# Altium PCB HIL_project.PcbDoc (part 1 of 3)
Units mm, origin at the board's own origin, x right, y up, seen from the top; angles counter-clockwise.
Board outline 165 x 120 mm, 2 copper layers (Top Layer, Bottom Layer); 116 components, 232 nets, 732 pads, 1218 vias.
Unrouted connection lines stored in the file: 107.
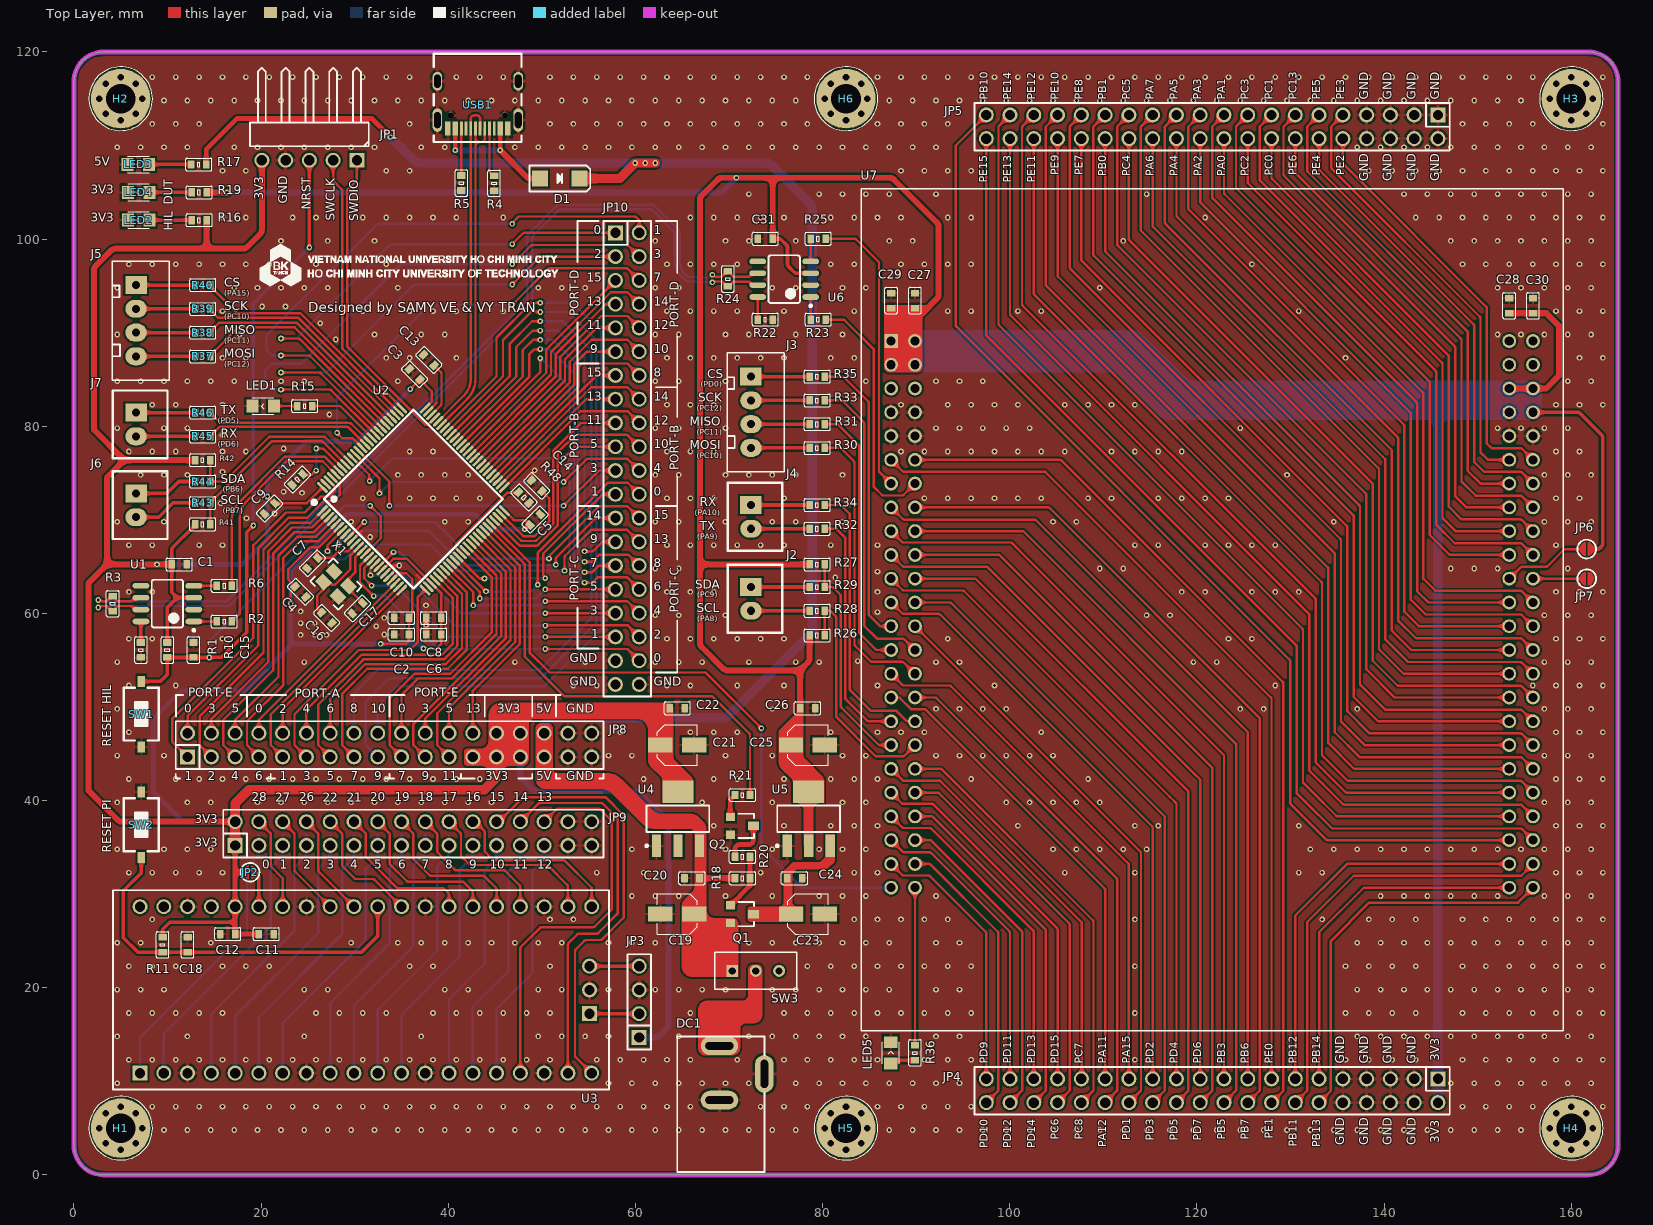
[diagram p0: Top Layer view]
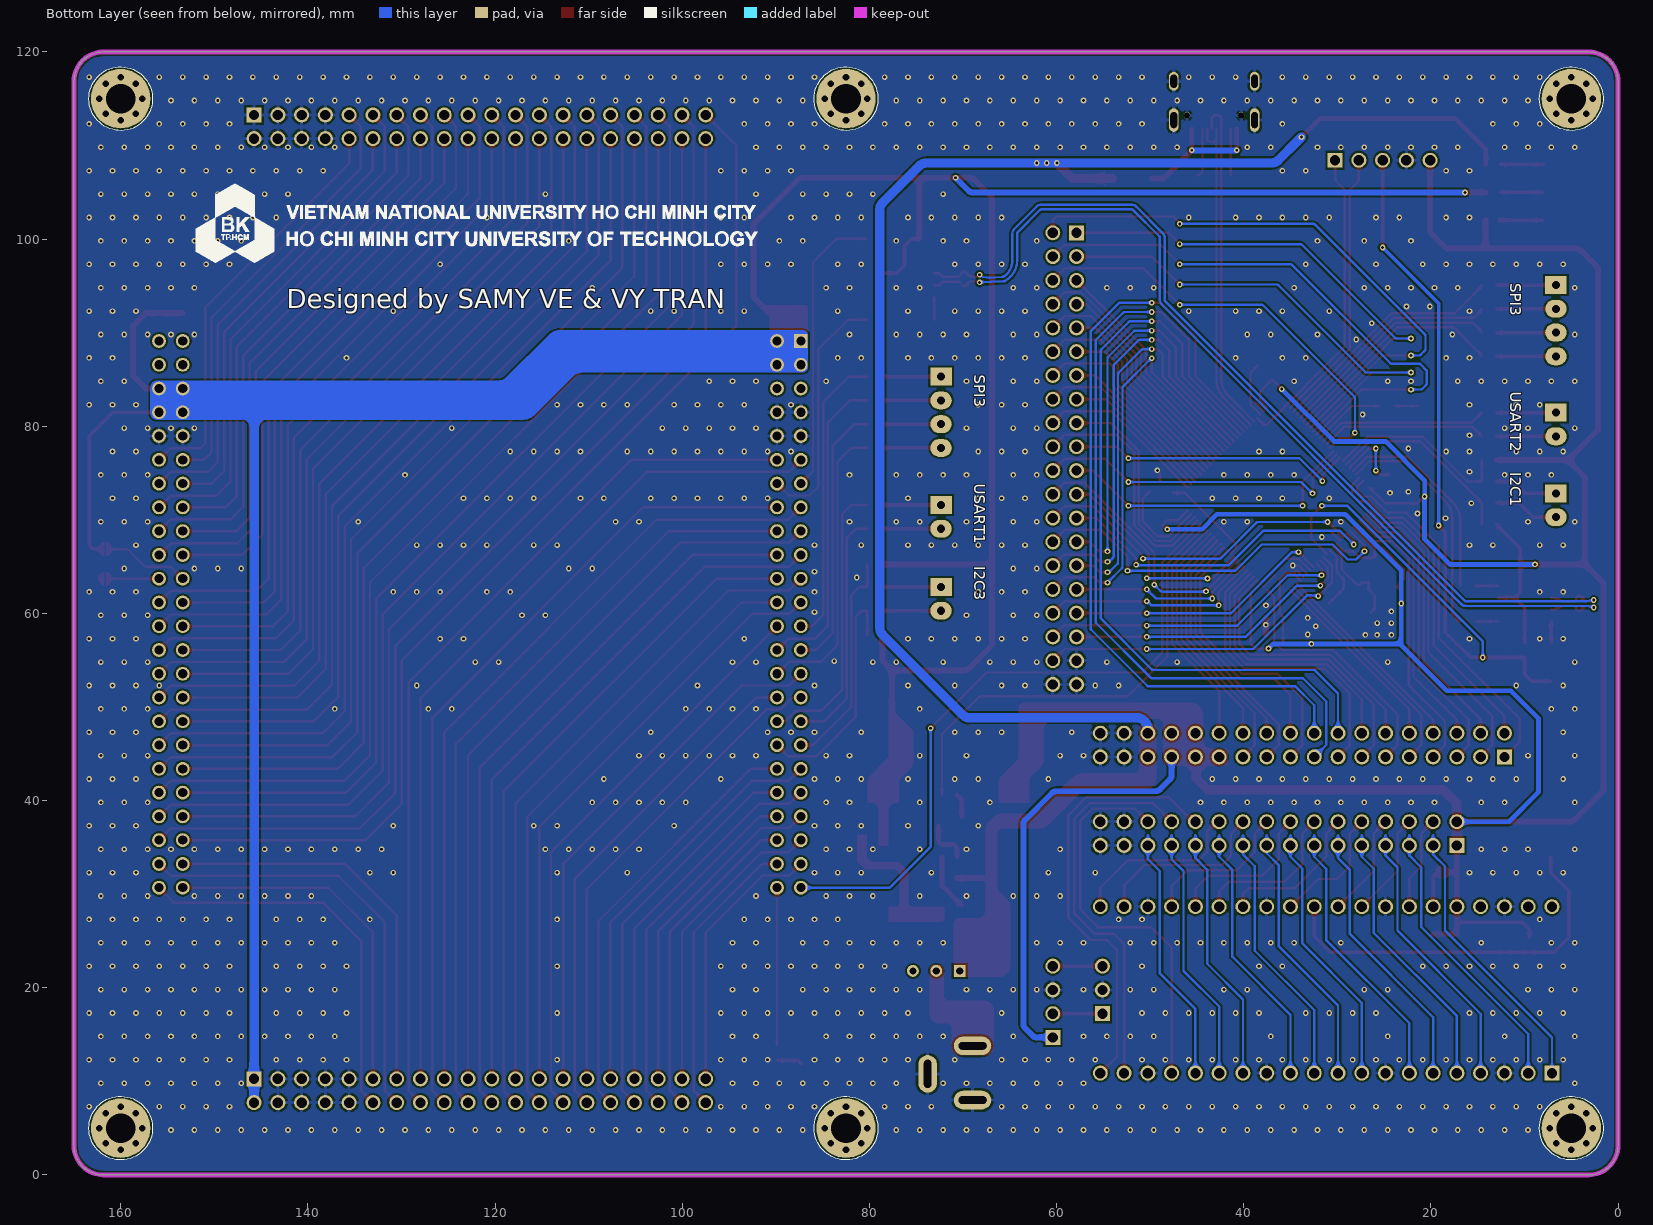
[diagram p1: Bottom Layer view, seen from below]

## Layer stack, top to bottom
Top Solder: solder mask 0.0102, Solder Resist, Dk 3.5
Top Layer: signal copper 0.0356
Dielectric 1: dielectric 0.32, FR-4, Dk 4.8
Bottom Layer: signal copper 0.0356
Bottom Solder: solder mask 0.0102, Solder Resist, Dk 3.5

## Board outline
0,3.15 0,116.85 cw(c3.15,116.85) 3.15,120 161.85,120 cw(c161.85,116.85) 165,116.85 165,3.15 cw(c161.85,3.15) 161.85,0 3.15,0 cw(c3.15,3.15)

## Design rules (kind name [scope] priority, off if disabled: settings)
Clearance [All] p1: gap=0.203 ignorepadtopadclearanceinfootprint=TRUE except(0.178: Arc-Arc Arc-Track Track-Track)
DiffPairsRouting [All] p1: maxlimit=0.254 minlimit=0.203 mostfreqgap=0.254 toplayer_minwidth=0.254 toplayer_maxwidth=0.381 toplayer_prefwidth=0.254 bottomlayer_minwidth=0.254 bottomlayer_maxwidth=0.381 bottomlayer_prefwidth=0.254 maxuncoupledlength=12.7
HoleSize [All] p1: absolutevalues=TRUE maxlimit=4 minlimit=0.025 maxpercent=80.000 minpercent=20.000
MinimumSolderMaskSliver [All] p1: minsoldermaskwidth=0.1
PolygonConnect [All] p1: thpad.connectstyle=Relief thpad.reliefconductorwidth=0.381 thpad.reliefentries=4 thpad.polygonreliefangle="90 Angle" thpad.airgapwidth=0.254 smdpad.connectstyle=Relief smdpad.reliefconductorwidth=0.254 smdpad.reliefentries=4 smdpad.polygonreliefangle="90 Angle" smdpad.airgapwidth=0.254 via.connectstyle=Direct via.reliefconductorwidth=0.254 via.reliefentries=4 via.polygonreliefangle="90 Angle" via.airgapwidth=0.254
RoutingVias [All] p1: holewidth=0.3 width=0.6 viastyle="Through Hole" minholewidth=0.3 minwidth=0.6 maxholewidth=0.711 maxwidth=1.27
SilkToSilkClearance [All] p1: silktosilkclearance=0.12
SilkToSolderMaskClearance [IsPad] p1: minsilkscreentomaskgap=0.12 clearancetoexposedcopper=TRUE
SolderMaskExpansion [All] p1: expansion=0.102 istentingtop=FALSE
SupplyNets "Schematic Supply Nets_3" [InNet('+3.3 DUT')] p1: voltage=0.000
SupplyNets "Schematic Supply Nets_2" [InNet('+3.3 HIL')] p2: voltage=0.000
SupplyNets "Schematic Supply Nets_1" [InNet('GND')] p3: voltage=0.000
SupplyNets "Schematic Supply Nets" [InNet('+5')] p4: voltage=0.000
Width [All] p1: maxlimit=2.54 minlimit=0.254 preferedwidth=0.254
25 further rules are at their usual default settings.

## Classes and differential pairs
component class Power: C19 C20 C21 C22 C23 C24 C25 C26 DC1 H1 H2 H3 H4 H5 H6 LED2 LED3 LED4 Q1 Q2 R16 R17 R18 R19 R20 R21 SW3 U4 U5
component class HIL_Header: J5 J6 J7 JP8 JP9 JP10 R37 R38 R39 R40 R41 R42 R43 R44 R45 R46
component class HIL: C1 C2 C3 C4 C5 C6 C7 C8 C9 C10 C11 C12 C13 C14 C15 C16 C17 C18 D1 JP1 JP2 JP3 LED1 R1 R2 R3 R4 R5 R6 R10 R11 R14 R15 R48 SW1 SW2 U1 U2 U3 USB1 X1
component class DUT: C27 C28 C29 C30 C31 J2 J3 J4 JP4 JP5 JP6 JP7 LED5 R22 R23 R24 R25 R26 R27 R28 R29 R30 R31 R32 R33 R34 R35 R36 U6 U7
differential pair CAN: +CAN_P -CAN_N
differential pair HIL_D: +HIL_D_P -HIL_D_N

## Components (designator, comment, footprint, x,y, rotation, side; value= is the part's Value field where it differs from the comment)
C1 "0.1uF" CN-SMD-0603 11.256,65.238 r0 top value=33pF
C2 "4.7uF" CN-SMD-0603 35.005,57.745 r180 top value=33pF
C3 "0.1uF" CN-SMD-0603 36.402,85.558 r135 top value=33pF
C4 "0.1uF" CN-SMD-0603 24.21,62.317 r315 top value=33pF
C5 "0.1uF" CN-SMD-0603 49.276,70.028 r45 top value=33pF
C6 "0.1uF" CN-SMD-0603 38.434,57.745 r180 top value=33pF
C7 "1uF" CN-SMD-0603 25.48,65.365 r225 top value=33pF
C8 "0.1uF" CN-SMD-0603 38.434,59.523 r180 top value=33pF
C9 "0.1uF" CN-SMD-0603 20.908,71.207 r225 top value=33pF
C10 "1uF" CN-SMD-0603 35.005,59.523 r180 top value=33pF
C11 "0.1uF" CN-SMD-0603 20.565,25.741 r0 top value=33pF
C12 "4.7uF" CN-SMD-0603 16.425,25.741 r180 top value=33pF
C13 "1uF" CN-SMD-0603 37.926,87.082 r315 top value=33pF
C14 "1uF" CN-SMD-0603 49.454,73.635 r315 top value=33pF
C15 "0.1uF" CN-SMD-0603 12.78,56.094 r270 top value=33pF
C16 "10pF" CN-SMD-0603 27.004,59.523 r135 top value=33pF
C17 "10pF" CN-SMD-0603 30.306,60.539 r225 top value=33pF
C18 "0.1uF" CN-SMD-0603 12.145,24.598 r270 top value=33pF
C19 "10uF" CAP-ALU-SMD-4.5x5x1.4 64.469,27.875 r180 top value=104
C20 "0.1uF" CN-SMD-0603 66.044,31.71 r0 top value=33pF
C21 "10uF" CAP-ALU-SMD-4.5x5x1.4 64.469,45.934 r0 top value=104
C22 "0.1uF" CN-SMD-0603 64.469,49.871 r180 top value=33pF
C23 "10uF" CAP-ALU-SMD-4.5x5x1.4 78.43,27.875 r0 top value=104
C24 "0.1uF" CN-SMD-0603 77.005,31.71 r180 top value=33pF
C25 "10uF" CAP-ALU-SMD-4.5x5x1.4 78.43,45.934 r0 top value=104
C26 "0.1uF" CN-SMD-0603 78.392,49.871 r180 top value=33pF
C27 "0.1uF" CN-SMD-0603 89.869,93.432 r90 top value=33pF
C28 "0.1uF" CN-SMD-0603 153.369,92.886 r90 top value=33pF
C29 "0.1uF" CN-SMD-0603 87.329,93.432 r90 top value=33pF
C30 "0.1uF" CN-SMD-0603 155.909,92.886 r90 top value=33pF
C31 "0.1uF" CN-SMD-0603 73.874,100.036 r180 top value=33pF
D1 "SS34" DIO-SMD-A 51.918,106.477 r180 top value=1N5007
DC1 "Jack DC" DC0 68.975,10.9 r90 top value="Jac DC"
H1 "M3" M3 5,5 r0 top
H2 "M3" M3 5,115 r0 top
H3 "M3" M3 160,115 r0 top
H4 "M3" M3 160,5 r0 top
H5 "M3" M3 82.5,5 r0 top
H6 "M3" M3 82.5,115 r0 top
J2 "Header2" XH2.54-2-DIP 72.343,61.555 r270 top
J3 "Header4" XH2.54-4-DIP 72.343,81.494 r270 top
J4 "Header2" XH2.54-2-DIP 72.343,70.318 r270 top
J5 "Header4" XH2.54-4-DIP 6.644,91.279 r270 top
J6 "Header2" XH2.54-2-DIP 6.644,71.556 r270 top
J7 "Header2" XH2.54-2-DIP 6.644,80.192 r270 top
JP1 "JP5" JP5-D1C 18.81,110.965 r180 top
JP2 "JUMP2" JUMP2 18.817,32.345 r270 top
JP3 "JP4" JP4-D1T 60.405,14.692 r90 top
JP4 "JP20x2" JP20-D2T 121.619,9 r180 top
JP5 "JP20x2" JP20-D2T 121.619,112 r180 top
JP6 "JUMP2" JUMP2 161.65,66.875 r270 top
JP7 "JUMP2" JUMP2 161.65,63.714 r90 top
JP8 "JP18x2" JP18-D2T 33.735,45.934 r0 top
JP9 "JP16x2" JP16-D2T 36.275,36.477 r0 top
JP10 "JP20x2" JP20-D2T 59.135,76.541 r270 top
LED1 "LED" LED-0805-Red 20.222,82.159 r180 top value="LED 3 - 5 ly 2 Colour"
LED2 "LED" LED-0805-Red 6.933,102.022 r180 top value="LED 3 - 5 ly 2 Colour"
LED3 "LED" LED-0805-Red 6.883,107.974 r180 top value="LED 3 - 5 ly 2 Colour"
LED4 "LED" LED-0805-Red 6.933,104.998 r180 top value="LED 3 - 5 ly 2 Colour"
LED5 "LED" LED-0805-Red 87.278,13.041 r90 top value="LED 3 - 5 ly 2 Colour"
Q1 "AO3401" SOT23-123 71.403,27.875 r270 top
Q2 "2N222" SOT23-231 71.403,37.298 r270 top value=C1815
R1 "10k" RES-SMD-0603 7.161,56.094 r90 top
R2 "22R" RES-SMD-0603 16.082,59.142 r0 top
R3 "120R" RES-SMD-0603 4.144,61.047 r90 top
R4 "5.1k" RES-SMD-0603 44.907,105.969 r270 top
R5 "5.1k" RES-SMD-0603 41.407,105.994 r270 top
R6 "22R" RES-SMD-0603 16.082,62.952 r0 top
R10 "10k" RES-SMD-0603 9.986,56.094 r270 top
R11 "10k" RES-SMD-0603 9.478,24.598 r270 top
R14 "10k" RES-SMD-0603 23.887,74.313 r225 top
R15 "1k" RES-SMD-0603 24.667,82.159 r0 top
R16 "1k" RES-SMD-0603 13.385,102.022 r180 top
R17 "3k3" RES-SMD-0603 13.335,107.974 r180 top
R18 "10k" RES-SMD-0603 71.441,31.71 r180 top
R19 "1k" RES-SMD-0603 13.385,104.998 r180 top
R20 "1k" RES-SMD-0603 71.441,33.996 r180 top
R21 "1k" RES-SMD-0603 71.441,40.6 r0 top
R22 "10k" RES-SMD-0603 73.874,91.4 r180 top
R23 "22R" RES-SMD-0603 79.524,91.4 r0 top
R24 "120R" RES-SMD-0603 69.879,95.741 r90 top
R25 "22R" RES-SMD-0603 79.524,100.036 r0 top
R26 "4.7k" RES-SMD-0603 79.417,57.658 r0 top
R27 "4.7k" RES-SMD-0603 79.417,65.238 r0 top
R28 "22R" RES-SMD-0603 79.417,60.285 r180 top
R29 "22R" RES-SMD-0603 79.417,62.825 r180 top
R30 "22R" RES-SMD-0603 79.417,77.684 r180 top
R31 "22R" RES-SMD-0603 79.417,80.224 r180 top
R32 "22R" RES-SMD-0603 79.417,69.048 r180 top
R33 "22R" RES-SMD-0603 79.417,82.764 r180 top
R34 "22R" RES-SMD-0603 79.417,71.588 r180 top
R35 "22R" RES-SMD-0603 79.417,85.304 r180 top
R36 "1k" RES-SMD-0603 89.869,13.041 r90 top
R37 "22R" RES-SMD-0603 13.756,87.469 r180 top
R38 "22R" RES-SMD-0603 13.756,90.009 r180 top
R39 "22R" RES-SMD-0603 13.756,92.549 r180 top
R40 "22R" RES-SMD-0603 13.756,95.089 r180 top
R41 "4.7k" RES-SMD-0603 13.756,69.524 r0 top
R42 "4.7k" RES-SMD-0603 13.756,76.382 r0 top
R43 "22R" RES-SMD-0603 13.756,71.81 r180 top
R44 "22R" RES-SMD-0603 13.756,74.096 r180 top
R45 "22R" RES-SMD-0603 13.756,78.922 r180 top
R46 "22R" RES-SMD-0603 13.756,81.462 r180 top
R48 "10k" RES-SMD-0603 48.08,72.388 r135 top
SW1 "SW" SW1-SMD 7.192,49.236 r90 top value="SW chip 2 pin"
SW2 "SW" SW1-SMD 7.192,37.425 r270 top value="SW chip 2 pin"
SW3 "Switch 3x1" SS12D00 72.851,21.804 r90 top value="Switch 4x2"
U1 "SN65HVD230DR" SO8 9.986,61.047 r180 top
U2 "STM32F407VET6" LQFP100 36.275,72.223 r45 top locked
U3 "Raspberry Pi Pico" "RASPBERRY PI PICO" 31.195,19.772 r90 top locked
U4 "LM1117-3.3V" SOT223 64.544,38.06 r0 top
U5 "LM1117-3.3V" SOT223 78.505,38.06 r0 top
U6 "SN65HVD230DR" SO8 75.899,95.718 r180 top
U7 "STM32F407 DEV KIT" "STM32F407 DEV KIT" 121.619,59.904 r0 top locked
USB1 "USB TYPE C" "TYPE C 16P" 43.155,115.799 r180 top
X1 "8MHz" XT4-16.000MHZ-4_V 27.99,63.149 r315 top value=4Mhz

## Footprints (in the part's own frame and the unit in brackets; to place one, negate y for a bottom-side part, rotate by r counter-clockwise, add the part's x,y. Pads: shape width x height; smd on the part's side, far side on the other; paste and mask are expansions set on the pad)
CAP-ALU-SMD-4.5x5x1.4 [mm]
  rect 2.6x1.6 smd: 1(-1.8,0) 2(1.8,0)
  silkscreen extent -2.15,-2.15 2.15,2.15, body extent -2.5,-2.15 2.5,2.15, height 5.45
CN-SMD-0603 [mm]
  rrect10% 0.7x0.9 smd: 1(-0.8,0) 2(0.8,0)
  silkscreen extent -1.4,-0.67 1.4,0.68, body extent -0.8,-0.4 0.8,0.4, height 0.3
DC0 [mm] "Jac DC input"
  oval 2x4 hole 0.8 slot 3 at 90 deg: 1(2.9,0) 2(-2.9,0)
  oval 4x2 hole 0.8 slot 3 at 0 deg: 3(-0.1,-4.8)
  silkscreen extent -10.6,-4.8 3.9,4.5, body extent -10.6,-4.9 3.9,4.5, height 10.7
DIO-SMD-A [mm]
  rect 1.7x1.7 smd: 1(2.1,0) 2(-2.1,0)
  silkscreen extent -3.25,-1.4 3.25,1.4, body extent -2.6,-1.3 2.6,1.3, height 2.4
JP4-D1T [mm] "4 pins, 1 row, straight, gold plating"
  rect 1.6x1.6 hole 1.1: 1(0,0)
  round 1.6 hole 1.1: 2(2.54,0) 3(5.08,0) 4(7.62,0)
  silkscreen extent -1.27,-1.27 8.89,1.27, body extent -1.27,-1.27 8.89,1.27, height 8.54
JP5-D1C [mm] "5 pins, 1 row, right angled, gold plating"
  rect 1.6x1.6 hole 1.1: 1(-11.43,2.54)
  round 1.6 hole 1.1: 2(-8.89,2.54) 3(-6.35,2.54) 4(-3.81,2.54) 5(-1.27,2.54)
  silkscreen extent -12.7,-7.34 0,1.04, body extent -12.7,-7.52 0,2.84, height 2.55
JP16-D2T [mm] "32 pins, dual pin, straight, gold plating"
  rect 1.6x1.6 hole 1.1: 1(-19.05,-1.27)
  round 1.6 hole 1.1: 2(-16.51,-1.27) 3(-13.97,-1.27) 4(-11.43,-1.27) 5(-8.89,-1.27) 6(-6.35,-1.27) 7(-3.81,-1.27) 8(-1.27,-1.27) 9(1.27,-1.27) 10(3.81,-1.27) 11(6.35,-1.27) 12(8.89,-1.27) 13(11.43,-1.27) 14(13.97,-1.27) 15(16.51,-1.27) 16(19.05,-1.27) 17(19.05,1.27) 18(16.51,1.27) 19(13.97,1.27) 20(11.43,1.27) 21(8.89,1.27) 22(6.35,1.27) 23(3.81,1.27) 24(1.27,1.27) 25(-1.27,1.27) 26(-3.81,1.27) 27(-6.35,1.27) 28(-8.89,1.27) 29(-11.43,1.27) 30(-13.97,1.27) 31(-16.51,1.27) 32(-19.05,1.27)
  silkscreen extent -20.32,-2.54 20.32,2.54, body extent -20.32,-2.54 20.32,2.54, height 8.55
JP18-D2T [mm] "36 pins, dual pin, straight, gold plating"
  rect 1.6x1.6 hole 1.1: 1(-21.59,-1.27)
  round 1.6 hole 1.1: 2(-19.05,-1.27) 3(-16.51,-1.27) 4(-13.97,-1.27) 5(-11.43,-1.27) 6(-8.89,-1.27) 7(-6.35,-1.27) 8(-3.81,-1.27) 9(-1.27,-1.27) 10(1.27,-1.27) 11(3.81,-1.27) 12(6.35,-1.27) 13(8.89,-1.27) 14(11.43,-1.27) 15(13.97,-1.27) 16(16.51,-1.27) 17(19.05,-1.27) 18(21.59,-1.27) 19(21.59,1.27) 20(19.05,1.27) 21(16.51,1.27) 22(13.97,1.27) 23(11.43,1.27) 24(8.89,1.27) 25(6.35,1.27) 26(3.81,1.27) 27(1.27,1.27) 28(-1.27,1.27) 29(-3.81,1.27) 30(-6.35,1.27) 31(-8.89,1.27) 32(-11.43,1.27) 33(-13.97,1.27) 34(-16.51,1.27) 35(-19.05,1.27) 36(-21.59,1.27)
  silkscreen extent -22.86,-2.54 22.86,2.54, body extent -22.86,-2.54 22.86,2.54, height 8.55
JP20-D2T [mm] "40 pins, dual pin, straight, gold plating"
  rect 1.6x1.6 hole 1.1: 1(-24.13,-1.27)
  round 1.6 hole 1.1: 2(-21.59,-1.27) 3(-19.05,-1.27) 4(-16.51,-1.27) 5(-13.97,-1.27) 6(-11.43,-1.27) 7(-8.89,-1.27) 8(-6.35,-1.27) 9(-3.81,-1.27) 10(-1.27,-1.27) 11(1.27,-1.27) 12(3.81,-1.27) 13(6.35,-1.27) 14(8.89,-1.27) 15(11.43,-1.27) 16(13.97,-1.27) 17(16.51,-1.27) 18(19.05,-1.27) 19(21.59,-1.27) 20(24.13,-1.27) 21(24.13,1.27) 22(21.59,1.27) 23(19.05,1.27) 24(16.51,1.27) 25(13.97,1.27) 26(11.43,1.27) 27(8.89,1.27) 28(6.35,1.27) 29(3.81,1.27) 30(1.27,1.27) 31(-1.27,1.27) 32(-3.81,1.27) 33(-6.35,1.27) 34(-8.89,1.27) 35(-11.43,1.27) 36(-13.97,1.27) 37(-16.51,1.27) 38(-19.05,1.27) 39(-21.59,1.27) 40(-24.13,1.27)
  silkscreen extent -25.4,-2.54 25.4,2.54, body extent -25.4,-2.54 25.4,2.54, height 8.55
JUMP2 [mil]
  round 1 smd: 1(0,17.33) 2(0,-17.33)
  Top Layer region: -29.08,5.13 -23.68,17.63 -13.25,26.39 0,29.53 13.25,26.39 23.68,17.63 29.08,5.13 29.08,5.13
  Top Layer region: 29.08,-5.13 23.68,-17.63 13.25,-26.39 0,-29.53 -13.25,-26.39 -23.68,-17.63 -29.08,-5.13 -29.08,-5.13
  silkscreen extent -39,-39 39,39
LED-0805-Red [mil]
  rect 50x55 smd: 1(-45,0) 2(45,0)
  silkscreen extent -45,-35 45,35, body extent -40,-25 40,25, height 43
LQFP100 [mm]
  rect 1.5x0.32 smd: 1(-7.75,6)
  oval 1.5x0.32 smd: 2(-7.75,5.5) 3(-7.75,5) 4(-7.75,4.5) 5(-7.75,4) 6(-7.75,3.5) 7(-7.75,3) 8(-7.75,2.5) 9(-7.75,2) 10(-7.75,1.5) 11(-7.75,1) 12(-7.75,0.5) 13(-7.75,0) 14(-7.75,-0.5) 15(-7.75,-1) 16(-7.75,-1.5) 17(-7.75,-2) 18(-7.75,-2.5) 19(-7.75,-3) 20(-7.75,-3.5) 21(-7.75,-4) 22(-7.75,-4.5) 23(-7.75,-5) 24(-7.75,-5.5) 25(-7.75,-6) 51(7.75,-6) 52(7.75,-5.5) 53(7.75,-5) 54(7.75,-4.5) 55(7.75,-4) 56(7.75,-3.5) 57(7.75,-3) 58(7.75,-2.5) 59(7.75,-2) 60(7.75,-1.5) 61(7.75,-1) 62(7.75,-0.5) 63(7.75,0) 64(7.75,0.5) 65(7.75,1) 66(7.75,1.5) 67(7.75,2) 68(7.75,2.5) 69(7.75,3) 70(7.75,3.5) 71(7.75,4) 72(7.75,4.5) 73(7.75,5) 74(7.75,5.5) 75(7.75,6)
  oval 0.32x1.5 smd: 26(-6,-7.75) 27(-5.5,-7.75) 28(-5,-7.75) 29(-4.5,-7.75) 30(-4,-7.75) 31(-3.5,-7.75) 32(-3,-7.75) 33(-2.5,-7.75) 34(-2,-7.75) 35(-1.5,-7.75) 36(-1,-7.75) 37(-0.5,-7.75) 38(0,-7.75) 39(0.5,-7.75) 40(1,-7.75) 41(1.5,-7.75) 42(2,-7.75) 43(2.5,-7.75) 44(3,-7.75) 45(3.5,-7.75) 46(4,-7.75) 47(4.5,-7.75) 48(5,-7.75) 49(5.5,-7.75) 50(6,-7.75) 76(6,7.75) 77(5.5,7.75) 78(5,7.75) 79(4.5,7.75) 80(4,7.75) 81(3.5,7.75) 82(3,7.75) 83(2.5,7.75) 84(2,7.75) 85(1.5,7.75) 86(1,7.75) 87(0.5,7.75) 88(0,7.75) 89(-0.5,7.75) 90(-1,7.75) 91(-1.5,7.75) 92(-2,7.75) 93(-2.5,7.75) 94(-3,7.75) 95(-3.5,7.75) 96(-4,7.75) 97(-4.5,7.75) 98(-5,7.75) 99(-5.5,7.75) 100(-6,7.75)
  silkscreen extent -7.95,-6.75 6.75,7.45, body extent -8,-8 8,8, height 1.6
M3 [mm]
  round 1 hole 0.7: 1(-2.286,0) 1(-1.616,-1.616) 1(-1.616,1.616) 1(0,-2.286) 1(0,2.286) 1(1.616,-1.616) 1(1.616,1.616) 1(2.286,0)
  round 6.35 hole 3.18: 1(0,0)
  silkscreen extent -3.4,-3.4 3.4,3.4
"RASPBERRY PI PICO" [mm]
  rect 1.6x1.6 hole 1.1: 1(-8.89,24.13) D1(-2.54,-23.9)
  round 1.6 hole 1.1: 2(-8.89,21.59) 3(-8.89,19.05) 4(-8.89,16.51) 5(-8.89,13.97) 6(-8.89,11.43) 7(-8.89,8.89) 8(-8.89,6.35) 9(-8.89,3.81) 10(-8.89,1.27) 11(-8.89,-1.27) 12(-8.89,-3.81) 13(-8.89,-6.35) 14(-8.89,-8.89) 15(-8.89,-11.43) 16(-8.89,-13.97) 17(-8.89,-16.51) 18(-8.89,-19.05) 19(-8.89,-21.59) 20(-8.89,-24.13) 21(8.89,-24.13) 22(8.89,-21.59) 23(8.89,-19.05) 24(8.89,-16.51) 25(8.89,-13.97) 26(8.89,-11.43) 27(8.89,-8.89) 28(8.89,-6.35) 29(8.89,-3.81) 30(8.89,-1.27) 31(8.89,1.27) 32(8.89,3.81) 33(8.89,6.35) 34(8.89,8.89) 35(8.89,11.43) 36(8.89,13.97) 37(8.89,16.51) 38(8.89,19.05) 39(8.89,21.59) 40(8.89,24.13) D2(0,-23.9) D3(2.54,-23.9)
  silkscreen extent -10.65,-26 10.65,27, body extent -10.5,-25.65 10.5,26.8, height 14.79
RES-SMD-0603 [mm]
  rrect10% 0.7x0.9 smd: 1(-0.8,0) 2(0.8,0)
  silkscreen extent -1.4,-0.67 1.4,0.68, body extent -0.8,-0.4 0.8,0.4, height 0.43
SO8 [mm] "SOIC, 8-Leads, Body 4.9x3.9mm, Pitch 1.27mm, IPC High Density"
  oval 1.8x0.6 smd: 1(-2.825,1.905) 2(-2.825,0.635) 3(-2.825,-0.635) 4(-2.825,-1.905) 5(2.825,-1.905) 6(2.825,-0.635) 7(2.825,0.635) 8(2.825,1.905)
  silkscreen extent -2.95,-2.55 1.68,2.98, body extent -2.99,-2.45 3,2.45, height 1.6
SOT23-123 [mm] "SOT23, 1=bottom-left, 2=top, 3=bottom-right"
  rect 0.9x0.95 smd: 1(-0.95,-1.25) 3(0.95,-1.25)
  rect 0.9x1.2 smd: 2(0,1.2)
  silkscreen extent -1.3,-0.38 1.3,1.25, body extent -1.52,-1.23 1.48,1.27, height 1.15
SOT23-231 [mm]
  rect 0.9x0.95 smd mask+0: 1(0.95,-1.25)
  rect 0.9x0.95 smd: 2(-0.95,-1.25)
  rect 0.9x1.2 smd: 3(0,1.2)
  silkscreen extent -1.3,-0.38 1.3,1.25, body extent -1.52,-1.23 1.48,1.27, height 1.15
SOT223 [mm]
  rect 1x2.4 smd: 1(-2.3,-2.9) 2(0,-2.9) 3(2.3,-2.9)
  rect 3.3x2.4 smd: 4(0,2.9)
  silkscreen extent -3.47,-3.02 3.35,1.4, body extent -3.25,-3.56 3.25,3.4, height 1.68
SS12D00 [mil]
  rect 50x50 hole 30 paste-99999 mask+0: 1(0,98.43)
  round 50 hole 30 paste-99999 mask+0: 2(0,0) 3(0,-98.43)
  silkscreen extent -78,-172 78,172, body extent -69,-167 69,167, height 245
"STM32F407 DEV KIT" [mm]
  rect 1.478x1.478 hole 0.97: 1(-34.29,29.21)
  round 1.478 hole 0.97: 2(-31.75,29.21) 3(-34.29,26.67) 4(-31.75,26.67) 5(-34.29,24.13) 6(-31.75,24.13) 7(-34.29,21.59) 8(-31.75,21.59) 9(-34.29,19.05) 10(-31.75,19.05) 11(-34.29,16.51) 12(-31.75,16.51) 13(-34.29,13.97) 14(-31.75,13.97) 15(-34.29,11.43) 16(-31.75,11.43) 17(-34.29,8.89) 18(-31.75,8.89) 19(-34.29,6.35) 20(-31.75,6.35) 21(-34.29,3.81) 22(-31.75,3.81) 23(-34.29,1.27) 24(-31.75,1.27) 25(-34.29,-1.27) 26(-31.75,-1.27) 27(-34.29,-3.81) 28(-31.75,-3.81) 29(-34.29,-6.35) 30(-31.75,-6.35) 31(-34.29,-8.89) 32(-31.75,-8.89) 33(-34.29,-11.43) 34(-31.75,-11.43) 35(-34.29,-13.97) 36(-31.75,-13.97) 37(-34.29,-16.51) 38(-31.75,-16.51) 39(-34.29,-19.05) 40(-31.75,-19.05) 41(-34.29,-21.59) 42(-31.75,-21.59) 43(-34.29,-24.13) 44(-31.75,-24.13) 45(-34.29,-26.67) 46(-31.75,-26.67) 47(-34.29,-29.21) 48(-31.75,-29.21) 49(31.75,29.21) 50(34.29,29.21) 51(31.75,26.67) 52(34.29,26.67) 53(31.75,24.13) 54(34.29,24.13) 55(31.75,21.59) 56(34.29,21.59) 57(31.75,19.05) 58(34.29,19.05) 59(31.75,16.51) 60(34.29,16.51) 61(31.75,13.97) 62(34.29,13.97) 63(31.75,11.43) 64(34.29,11.43) 65(31.75,8.89) 66(34.29,8.89) 67(31.75,6.35) 68(34.29,6.35) 69(31.75,3.81) 70(34.29,3.81) 71(31.75,1.27) 72(34.29,1.27) 73(31.75,-1.27) 74(34.29,-1.27) 75(31.75,-3.81) 76(34.29,-3.81) 77(31.75,-6.35) 78(34.29,-6.35) 79(31.75,-8.89) 80(34.29,-8.89) 81(31.75,-11.43) 82(34.29,-11.43) 83(31.75,-13.97) 84(34.29,-13.97) 85(31.75,-16.51) 86(34.29,-16.51) 87(31.75,-19.05) 88(34.29,-19.05) 89(31.75,-21.59) 90(34.29,-21.59) 91(31.75,-24.13) 92(34.29,-24.13) 93(31.75,-26.67) 94(34.29,-26.67) 95(31.75,-29.21) 96(34.29,-29.21)
  silkscreen extent -37.5,-44.5 37.5,45.5, body extent -36.25,-42.55 36.25,44.05, height 14.2
SW1-SMD [mm]
  rect 1.2x0.8 smd: 1(-3.5,0) 2(3.5,0)
  silkscreen extent -2.82,-1.85 2.82,1.85, body extent -3.05,-1.85 3.05,1.85, height 2.5
"TYPE C 16P" [mm]
  rect 0.6x1.5 smd: A1(-3.202,4) A4(-2.402,4) B1(3.198,4) B4(2.398,4)
  rect 0.3x1.5 smd: A5(-1.252,4) A6(-0.252,4) A7(0.248,4) A8(-1.752,4) B5(1.748,4) B6(0.748,4) B7(-0.752,4) B8(1.248,4)
  oval 1x2.5 hole 0.7 slot 1.7 at 90 deg: SHIELD(-4.322,3.083) SHIELD(4.318,3.083)
  oval 1x2 hole 0.7 slot 1.4 at 90 deg: SHIELD(-4.322,-1.067) SHIELD(4.318,-1.067)
  round 0.65 hole 0.65 mask+0.102: SHIELD(-2.892,2.583) SHIELD(2.888,2.583)
  silkscreen extent -4.68,-4 4.69,5.43, body extent -4.47,-3.65 4.47,4.25, height 3.21
XH2.54-2-DIP [mil] "CON2"
  rect 75x90 hole 34: 1(-50,0)
  oval 75x90 hole 34: 2(50,0)
  silkscreen extent -143,-98 142,132, body extent -142,-98 142,132, height 284
XH2.54-4-DIP [mil] "CON4"
  rect 75x90 hole 34: 1(-150,0)
  oval 75x90 hole 34: 2(-50,0) 3(50,0) 4(150,0)
  silkscreen extent -250,-100 250,140, body extent -242,-91 250,137, height 276
XT4-16.000MHZ-4_V [mm] "Hand Drawn, 4-Leads, Body 3.2x2.5 mm"
  rect 1.4x1.2 smd: 1(-1.1,-0.8) 2(1.1,-0.8) 3(1.1,0.8) 4(-1.1,0.8)
  silkscreen extent -2.13,-1.75 2.13,1.75, body extent -1.6,-1.25 1.6,1.25, height 0.65

## Part data
C1 C2 C3 C4 C5 C6 C7 C8 C9 C10 C11 C12 C13 C14 C15 C16 C17 C18 C20 C22 C24 C26 C27 C28 C29 C30 C31: library part CN
C19 C21 C23 C25: library part CN-ALU-DIP, "Capacitor (Semiconductor SIM Model)", LatestRevisionDate=17-Jul-2002, LatestRevisionNote="Re-released for DXP Platform.", PackageReference=C1206, Publisher="Altium Limited"
D1: library part "Diode SMD", "Default Diode", Code - JEDEC=DO-214-AB, Published=8-Jun-2000, Publisher="Altium Limited", Revision="July-2002: Re-released for DXP Platform."
DC1: library part DCIN, "Jack DC input"
J2 J4 J6 J7: "Connector 2", Manufacturer="W¨¹rth Elektronik eiSos GmbH", partNo=613002143121, ComponentLink1 Description=Manufacturer, ComponentLink1URL=http://www.we-online.com, ComponentLink2 Description=Datasheet, ComponentLink2URL=http://katalog.we-online.de/em/datasheet/6130xx143121.pdf, Created by="Karrer Zheng", Created Date="29 March 2013", NoPins=02
J3 J5: "Connector 4", Manufacturer="W¨¹rth Elektronik eiSos GmbH", partNo=613002143121, ComponentLink1 Description=Manufacturer, ComponentLink1URL=http://www.we-online.com, ComponentLink2 Description=Datasheet, ComponentLink2URL=http://katalog.we-online.de/em/datasheet/6130xx143121.pdf, Created by="Karrer Zheng", Created Date="29 March 2013", NoPins=02
JP1: "WR-PHD 2.54 mm Angled Socket Header", Manufacturer="W¨¹rth Elektronik eiSos GmbH", partNo=613005143121, ComponentLink1 Description=Manufacturer, ComponentLink1URL=http://www.we-online.com, ComponentLink2 Description=Datasheet, ComponentLink2URL=http://katalog.we-online.de/em/datasheet/6130xx143121.pdf, Created by="Karrer Zheng", Created Date="29 March 2013", NoPins=05
JP3: "WR-PHD 2.54 mm Angled Socket Header", Manufacturer="W¨¹rth Elektronik eiSos GmbH", partNo=613004143121, ComponentLink1 Description=Manufacturer, ComponentLink1URL=http://www.we-online.com, ComponentLink2 Description=Datasheet, ComponentLink2URL=http://katalog.we-online.de/em/datasheet/6130xx143121.pdf, Created by="Karrer Zheng", Created Date="29 March 2013", NoPins=04
JP4 JP5 JP10: "WR-PHD 2.54 mm Dual Socket Header", Manufacturer="W¨¹rth Elektronik eiSos GmbH", partNo=61304021821, ComponentLink1 Description=Manufacturer, ComponentLink1URL=http://www.we-online.com, ComponentLink2 Description=Datasheet, ComponentLink2URL=http://katalog.we-online.de/em/datasheet/6130xx21821.pdf, Created by="Karrer Zheng", Created Date="29 March 2013", NoPins=40
JP8: "WR-PHD 2.54 mm Dual Socket Header", Manufacturer="W¨¹rth Elektronik eiSos GmbH", partNo=61303621821, ComponentLink1 Description=Manufacturer, ComponentLink1URL=http://www.we-online.com, ComponentLink2 Description=Datasheet, ComponentLink2URL=http://katalog.we-online.de/em/datasheet/6130xx21821.pdf, Created by="Karrer Zheng", Created Date="29 March 2013", NoPins=36
JP9: "WR-PHD 2.54 mm Dual Socket Header", Manufacturer="W¨¹rth Elektronik eiSos GmbH", partNo=61303221821, ComponentLink1 Description=Manufacturer, ComponentLink1URL=http://www.we-online.com, ComponentLink2 Description=Datasheet, ComponentLink2URL=http://katalog.we-online.de/em/datasheet/6130xx21821.pdf, Created by="Karrer Zheng", Created Date="29 March 2013", NoPins=32
LED1 LED2 LED3 LED4 LED5: library part "LED SMD"
Q1: "P-MOS 30V 4A"
Q2: "NPN 600mW, ECB"
R1 R2 R3 R4 R5 R6 R10 R11 R14 R15 R16 R17 R18 R19 R20 R21 R22 R23 R24 R25 R26 R27 R28 R29 R30 R31 R32 R33 R34 R35 R36 R37 R38 R39 R40 R41 R42 R43 R44 R45 R46 R48: library part Res-SMD, "Resistor", Manufacturer="Generic Components", Class=Passive, Published=08/06/2000, Publisher="Altium Hobart Technology Centre"
SW1 SW2: library part SW2, "Switch button 2 pin"
SW3: library part SW3x1
U1 U6: library part SN65HVD251DR, "IC TRANSCEIVER HALF 1/1 8SOIC"
U2: "High-performance foundation line, ARM Cortex-M4 core with DSP and FPU, 1 Mbyte Flash, 168 MHz CPU, ART Accelerator", Mfr_Name=STMicroelectronics, RefDes=RefDes, Type=Type
U4 U5: library part LM1117, "800mA Low-Dropout Linear Regulator", Creator="Nguyen Ba Bien", Website=http://group3i.net
X1: library part XT4, "Crystal, 16 MHz, -30 to 85 degC, 3.2 x 2.5 x 0.9 mm SMD"

## Via types
v1: diameter 0.6, hole 0.3, Top Layer to Bottom Layer, tented both sides, 1218 vias

## Nets (pads, with @x,y where several pads share a name; then routed paths per layer and width w, separated by ;. In a path a pad name is that pad's centre, name@x,y a point inside that pad or via, vN(x,y) a via of type N, cw(c..) or ccw(c..) an arc to the next point about the centre after c; other vN are vias at no path point)
"+3.3 DUT": C25.1 C26.2 C27.1 C28.1 C29.1 C30.1 C31.1 JP4.1 JP4.40 JP6.1 R19.1 R26.1 R27.1 U5.2 U5.4 U6.3 U7.1 U7.2 U7.3 U7.4 U7.53 U7.54 U7.55 U7.56 | length 304.7
  Top Layer w0.381: C31.1@74.674,100.036 75.32,100.036 cw(c75.32,99.655) 75.589,99.925 76.139,99.375 cw(c75.87,99.105) 76.175,99.334 cw(c75.87,99.105) 76.251,99.105 76.251,97.336 ccw(c76.632,97.338) 76.361,97.07 76.968,96.463 ccw(c77.236,96.734) 77.234,96.353 U6.3@78.724,96.353 ; U7.56@155.909,81.494 160.664,81.494 cw(c160.664,81.113) 160.893,81.418 cw(c160.664,81.113) 160.933,81.383 163.236,79.08 cw(c162.966,78.811) 163.271,79.039 cw(c162.966,78.811) 163.347,78.811 163.347,67.417 cw(c162.966,67.417) 163.236,67.148 163.075,66.986 cw(c162.805,67.256) 162.805,66.875 JP6.1@162.09,66.875
  Top Layer w0.635: R19.1@14.185,104.998 14.204,104.978 v1(16.358,104.978) ; C31.1@74.674,100.036 74.674,106.553 ; C26.2@77.592,49.871 77.592,53.917 ; R26.1@78.617,57.658 78.617,55.205 cw(c77.982,55.205) 78.49,54.824 cw(c77.982,55.205) 78.432,54.757 77.592,53.917 ; R27.1@78.617,65.238 66.878,65.238 ; C29.1@87.329,92.632 C27.1@89.869,92.632 90.944,92.632 ccw(c90.944,93.267) 91.392,92.817 92.208,93.633 ccw(c91.759,94.082) 92.267,93.701 ccw(c91.759,94.082) 92.394,94.082 92.394,101.323 ccw(c91.759,101.323) 92.267,101.704 ccw(c91.759,101.323) 92.208,101.772 87.613,106.367 ccw(c87.164,105.918) 87.545,106.426 ccw(c87.164,105.918) 87.164,106.553 74.674,106.553 ; U7.53@153.369,84.034 157.313,84.034 158.674,85.395 158.674,90.754 157.342,92.086 C28.1@153.369,92.086 ; 66.878,65.238 66.878,104.182 cw(c67.513,104.182) 67.005,104.563 cw(c67.513,104.182) 67.063,104.63 68.801,106.368 cw(c69.249,105.918) 68.868,106.426 cw(c69.249,105.918) 69.249,106.553 v1(70.792,106.553) 74.674,106.553 ; 66.878,65.238 66.878,56.885 ccw(c67.513,56.885) 67.064,56.436 69.398,54.102 ccw(c69.846,54.552) 69.465,54.044 ccw(c69.846,54.552) 69.846,53.917 77.592,53.917
  Bottom Layer w0.635: v1(16.358,104.978) 68.955,104.978 ccw(c68.955,105.613) 69.336,105.105 ccw(c68.955,105.613) 69.403,105.163 v1(70.792,106.553)
  Bottom Layer w1: JP4.40@145.749,7.73 JP4.1@145.749,10.27 145.749,82.165
"+3.3 HIL": C1.1 C2.1 C3.1 C4.1 C5.1 C6.1 C7.1 C8.1 C9.1 C10.1 C11.1 C12.1 C21.1 C22.2 JP1.5 JP2.2 JP3.1 JP8.13 JP8.14 JP8.15 JP8.22 JP8.23 JP9.1 JP9.32 R10.1 R11.1 R16.1 R41.1 R42.1 U1.3 U2.6 U2.11 U2.19 U2.21 U2.22 U2.28 U2.50 U2.75 U2.100 U3.36 U4.4 | length 428
  Top Layer w0.254: v1(20.676,72.492) 20.715,72.492 21.434,71.773 C9.1@21.474,71.773 ; C9.1@21.544,71.702 21.86,71.702 21.93,71.773 24.864,71.773 U2.100@26.552,73.46 ; v1(23.165,61.062) 23.165,62.298 cw(c23.419,62.298) 23.239,62.477 C4.1@23.644,62.883 22.96,63.567 cw(c23.139,63.747) 22.885,63.747 22.885,64.586 cw(c23.139,64.586) 22.936,64.738 cw(c23.139,64.586) 22.96,64.765 25.173,66.978 ; 25.173,66.979 cw(c25.352,66.798) 25.199,67.001 cw(c25.352,66.798) 25.352,67.052 26.049,67.052 ; U2.6@28.32,69.218 26.228,67.126 cw(c26.049,67.306) 26.202,67.103 cw(c26.049,67.306) 26.049,67.052 ; U2.11@30.088,67.45 29.273,66.635 28.281,66.635 27.577,65.931 C7.1@26.046,65.931 25.975,66.001 25.975,66.978 26.049,67.052 ; v1(32.766,56.744) 35.509,56.744 35.805,57.039 C2.1@35.805,57.745 C10.1@35.805,59.523 35.805,59.623 36.158,59.976 36.158,63.656 35.513,64.3 34.716,64.3 ; U2.19@32.916,64.622 34.131,65.837 35.59,65.837 U2.28@38.22,63.207 39.234,62.193 C8.1@39.234,59.523 C6.1@39.234,57.745 39.234,56.724 38.72,56.21 37.396,56.21 v1(37.349,56.257) ; U2.21@33.623,63.915 33.637,63.915 34.264,64.542 34.475,64.542 34.716,64.3 ; U2.22@33.977,63.561 34.716,64.3 ; v1(35.941,83.966) C3.1@36.968,84.992 38.156,83.804 cw(c37.977,83.624) 38.231,83.624 38.231,82.769 cw(c37.977,82.769) 38.157,82.59 U2.75@37.512,81.946 ; U2.50@45.998,70.986 46.957,70.026 ; 46.958,70.025 ccw(c47.137,70.206) 47.137,69.952 48.116,69.952 cw(c48.116,69.698) 48.295,69.878 48.482,69.691 C5.1@48.71,69.462 48.634,69.462 v1(48.17,68.998)
  Top Layer w0.381: R11.1@9.478,25.398 9.478,26.249 10.24,27.011 17.225,27.011 ; R10.1@9.986,56.894 9.986,60.626 11.042,61.682 ; U1.3@12.811,61.682 11.042,61.682 ; R41.1@12.956,69.524 12.796,69.286 10.567,67.057 ccw(c10.837,66.788) 10.532,67.017 ccw(c10.837,66.788) 10.456,66.788 C1.1@10.456,65.238 10.456,62.268 11.042,61.682
  Top Layer w0.508: JP9.1@17.225,35.207 17.225,32.345 ; JP2.2@18.377,32.345 17.225,32.345 ; C11.1@19.765,25.741 C12.1@17.225,25.741 17.225,27.011 U3.36@17.225,28.662 17.225,32.345
  Top Layer w0.635: C1.1@10.456,65.238 v1(8.879,65.238) 3.538,65.238 ; R42.1@12.956,76.382 5.382,76.382 ; R16.1@14.185,102.022 14.185,98.975 ; JP9.32@17.225,37.747 5.141,37.747 cw(c5.141,38.382) 4.76,37.874 cw(c5.141,38.382) 4.693,37.932 1.575,41.05 1.575,63.275 3.538,65.238 ; JP1.5@20.08,108.425 20.08,100.993 cw(c19.445,100.993) 19.953,100.612 cw(c19.445,100.993) 19.895,100.545 18.51,99.16 cw(c18.062,99.61) 18.443,99.102 cw(c18.062,99.61) 18.062,98.975 14.185,98.975 ; 3.538,65.238 3.538,74.538 5.382,76.382 ; 5.382,76.382 2.15,79.614 2.15,96.687 cw(c2.785,96.687) 2.277,97.068 cw(c2.785,96.687) 2.335,97.135 3.99,98.79 cw(c4.438,98.34) 4.057,98.848 cw(c4.438,98.34) 4.438,98.975 14.185,98.975
  Top Layer w1: JP9.1@17.225,35.207 JP9.32@17.225,37.747 17.225,39.7 18.7,41.175 43.875,41.175 45.064,42.364 45.064,44.563 JP8.14@45.165,44.664
  Bottom Layer w0.508: v1(8.879,65.238) 17.961,65.238 20.676,67.953 v1(20.676,72.492) 20.658,72.509 20.658,74.197 24.837,78.376 30.351,78.376 v1(35.941,83.966) ; JP9.32@17.225,37.747 11.656,37.747 8.509,40.894 8.509,48.793 11.455,51.74 18.288,51.74 23.165,56.617 v1(23.165,61.062) 23.165,64.407 cw(c23.673,64.407) 23.266,64.712 cw(c23.673,64.407) 23.313,64.765 28.986,70.439 cw(c29.344,70.079) 29.039,70.485 cw(c29.344,70.079) 29.344,70.587 42.861,70.587 44.45,68.998 v1(48.17,68.998) ; 23.165,56.744 v1(32.766,56.744) ; v1@32.791,56.744 36.838,56.744 37.324,56.257 v1(37.349,56.257)
  Bottom Layer w0.635: JP8.15@47.705,44.664 47.705,42.708 ccw(c48.34,42.708) 47.832,42.327 ccw(c48.34,42.708) 47.89,42.26 48.964,41.186 ccw(c49.413,41.635) 49.413,41 60.037,41 cw(c60.037,40.365) 60.486,40.814 63.365,37.935 cw(c62.915,37.487) 63.423,37.868 cw(c62.915,37.487) 63.55,37.487 63.55,16.138 cw(c62.915,16.138) 63.423,15.757 cw(c62.915,16.138) 63.365,15.69 62.552,14.877 cw(c62.104,15.327) 62.104,14.692 JP3.1@60.405,14.692
+5: C19.1 C20.2 D1.2 JP8.16 JP8.21 Q1.3 R17.1 R18.2 SW3.1 U4.3 | length 163.1
  Top Layer w0.508: R17.1@14.135,107.974 14.135,109.588 17.424,112.878 31.852,112.878 v1(33.833,110.896)
  Top Layer w0.635: C20.2@66.844,31.71 R18.2@70.641,31.71
  Top Layer w1: D1.2@54.018,106.477 58.318,106.477 v1(59.969,108.128) v1(62.122,108.128)
  Bottom Layer w1: v1(33.833,110.896) 34.196,110.534 36.308,108.421 36.31,108.419 ccw(c37.016,109.128) 37.016,108.128 v1(59.969,108.128) v1(61.046,108.128) v1(62.122,108.128) 73.932,108.128 cw(c73.932,107.128) 74.639,107.835 78.591,103.883 cw(c77.884,103.176) 78.884,103.184 cw(c77.884,103.176) 78.884,103.176 78.884,58.424 cw(c77.884,58.424) 78.592,57.718 70.015,49.141 cw(c69.309,49.849) 69.309,48.849 51.392,48.849 ccw(c51.392,47.849) 50.686,48.558 50.537,48.408 ccw(c51.245,47.702) 50.245,47.702 JP8.21@50.245,47.204
CAN_N: R3.2 R24.2 U1.6 U6.6 | length 103.6
  Top Layer w0.254: v1(2.591,61.433) 2.657,61.367 2.846,61.367 2.913,61.3 3.497,61.3 4.044,61.847 R3.2@4.144,61.847 cw(c4.144,61.606) 4.315,61.776 4.405,61.686 cw(c4.257,61.537) 4.467,61.537 ccw(c4.677,61.537) 4.529,61.388 4.541,61.375 ccw(c4.721,61.555) 4.721,61.301 5.97,61.301 ccw(c5.97,61.951) 6.43,61.492 cw(c6.89,61.032) 6.89,61.682 U1.6@7.161,61.682 ; v1(68.224,96.18) 68.318,96.18 68.525,95.973 69.211,95.973 69.779,96.541 R24.2@69.879,96.541 cw(c69.879,96.3) 70.05,96.471 70.3,96.22 70.3,96.118 70.449,95.969 72.15,95.969 72.533,96.353 U6.6@73.074,96.353
  Bottom Layer w0.254: v1(2.591,61.433) 3.399,61.301 16.238,61.301 ccw(c16.238,61.555) 16.417,61.375 48.376,93.334 ccw(c48.197,93.514) 48.451,93.514 48.451,100.128 cw(c49.213,100.128) 48.673,100.666 51.468,103.46 cw(c52.006,102.921) 52.006,103.683 61.61,103.683 cw(c61.61,102.921) 62.148,103.46 64.496,101.112 cw(c63.957,100.573) 64.719,100.573 64.719,100.364 ; 64.719,100.363 64.719,97.712 ccw(c66.801,97.712) 65.329,96.241 ccw(c66.345,97.257) 65.518,96.082 ccw(c66.345,97.257) 65.671,95.988 ccw(c65.789,96.212) 65.735,95.964 ccw(c65.921,96.833) 65.878,95.946 67.15,95.885 67.166,95.885 67.892,95.944 v1(68.224,96.18)
CAN_P: R3.1 R24.1 U1.7 U6.7 | length 103.4
  Top Layer w0.254: v1(2.591,60.63) 2.684,60.63 2.846,60.792 3.499,60.792 4.044,60.247 R3.1@4.144,60.247 ccw(c4.144,60.488) 4.315,60.318 4.405,60.408 ccw(c4.257,60.557) 4.467,60.557 cw(c4.677,60.557) 4.529,60.706 4.541,60.719 cw(c4.721,60.539) 4.721,60.793 5.97,60.793 cw(c5.97,60.143) 6.43,60.603 ccw(c6.89,61.062) 6.89,60.412 U1.7@7.161,60.412 ; v1(68.224,95.377) 68.291,95.443 68.525,95.443 68.546,95.465 69.256,95.465 69.779,94.941 69.979,94.941 70.289,95.251 70.289,95.313 70.438,95.461 72.152,95.461 72.531,95.083 U6.7@73.074,95.083
  Bottom Layer w0.254: v1(2.591,60.63) 3.187,60.793 16.238,60.793 ccw(c16.238,61.555) 16.777,61.016 48.736,92.975 ccw(c48.197,93.514) 48.959,93.514 48.959,100.128 cw(c49.213,100.128) 49.033,100.307 51.827,103.101 cw(c52.006,102.921) 52.006,103.175 61.61,103.175 cw(c61.61,102.921) 61.789,103.1 64.137,100.753 cw(c63.957,100.573) 64.211,100.573 64.211,100.363 64.211,97.712 ccw(c66.664,97.712) 64.826,96.087 ccw(c66.664,97.712) 64.93,95.978 65.099,95.83 ccw(c66.345,97.257) 65.173,95.769 65.505,95.507 65.68,95.497 66.96,95.428 v1(68.224,95.377)
DUT_CAN1_RX: R25.2 U7.13 | length 30.9
  Top Layer w0.254: R25.2@80.382,100.036 83.409,100.036 cw(c83.409,99.782) 83.561,99.985 cw(c83.409,99.782) 83.588,99.962 86.025,97.525 86.025,75.178 U7.13@87.329,73.874
DUT_CAN1_TX: R23.2 U7.14 | length 26.4
  Top Layer w0.254: R23.2@80.324,91.4 82.17,91.4 cw(c82.17,91.146) 82.322,91.349 cw(c82.17,91.146) 82.349,91.326 85.475,88.2 85.475,73.525 86.326,72.674 ccw(c86.505,72.854) 86.505,72.6 88.49,72.6 ccw(c88.49,72.854) 88.642,72.651 ccw(c88.49,72.854) 88.669,72.674 U7.14@89.869,73.874
DUT_DEBUG_LED: R36.2 U7.48 | length 16.9
  Top Layer w0.254: R36.2@89.869,13.841 U7.48@89.869,30.694
DUT_I2C3_SCL: R26.2 R28.1 U7.36 | length 25.4
  Top Layer w0.254: R26.2@80.217,57.658 R28.1@80.217,60.285 80.71,60.285 cw(c80.71,60.031) 80.889,60.211 81.376,59.724 cw(c81.196,59.545) 81.399,59.697 cw(c81.196,59.545) 81.45,59.545 81.45,49.054 ccw(c81.704,49.055) 81.523,48.877 81.524,48.876 85.602,44.798 ccw(c85.78,44.979) 85.779,44.725 88.555,44.725 ccw(c88.555,44.979) 88.707,44.776 ccw(c88.555,44.979) 88.734,44.799 U7.36@89.869,45.934
DUT_I2C3_SDA: R27.2 R29.1 U7.35 | length 23.5
  Top Layer w0.254: R27.2@80.217,65.238 R29.1@80.217,62.825 80.975,62.825 cw(c80.975,62.571) 81.128,62.774 cw(c80.975,62.571) 81.155,62.751 81.851,62.055 cw(c81.671,61.875) 81.874,62.028 cw(c81.671,61.875) 81.925,61.875 81.925,50.129 ccw(c82.179,50.13) 81.998,49.952 ; U7.35@87.329,45.934 86.12,45.934 cw(c86.121,46.188) 85.943,46.007 81.999,49.951 ; 81.998,49.952 81.999,49.951
DUT_PA0: JP5.31 U7.72 | length 68.6
  Top Layer w0.254: JP5.31@122.889,110.73 122.889,104.966 ccw(c123.143,104.966) 122.94,104.814 ccw(c123.143,104.966) 122.963,104.787 144.126,83.624 cw(c143.947,83.444) 144.15,83.596 cw(c143.947,83.444) 144.201,83.444 144.201,63.699 145.475,62.425 154.553,62.425 cw(c154.553,62.171) 154.732,62.351 U7.72@155.909,61.174
DUT_PA1: JP5.10 U7.71 | length 70.8
  Top Layer w0.254: JP5.10@122.889,113.27 121.625,112.006 121.625,104.505 ccw(c121.879,104.505) 121.676,104.353 ccw(c121.879,104.505) 121.699,104.326 143.449,82.576 cw(c143.269,82.396) 143.473,82.549 cw(c143.269,82.396) 143.523,82.396 143.523,62.377 144.726,61.174 U7.71@153.369,61.174
DUT_PA2: JP5.30 U7.74 | length 72.8
  Top Layer w0.254: JP5.30@120.349,110.73 120.349,104.031 ccw(c120.603,104.031) 120.4,103.879 ccw(c120.603,104.031) 120.423,103.852 142.772,81.503 cw(c142.592,81.324) 142.795,81.476 cw(c142.592,81.324) 142.846,81.324 142.846,61.479 144.44,59.885 154.553,59.885 cw(c154.553,59.631) 154.732,59.811 U7.74@155.909,58.634
DUT_PA3: JP5.11 U7.73 | length 75
  Top Layer w0.254: JP5.11@120.349,113.27 119.075,111.996 119.075,103.305 ccw(c119.329,103.305) 119.126,103.153 ccw(c119.329,103.305) 119.149,103.126 142.094,80.181 cw(c141.915,80.001) 142.118,80.154 cw(c141.915,80.001) 142.169,80.001 142.169,60.181 143.716,58.634 U7.73@153.369,58.634
DUT_PA4: JP5.29 U7.76 | length 77
  Top Layer w0.254: JP5.29@117.809,110.73 117.809,102.569 ccw(c118.063,102.571) 117.882,102.393 141.417,78.858 cw(c141.237,78.679) 141.44,78.831 cw(c141.237,78.679) 141.491,78.679 141.491,59.259 143.405,57.345 154.553,57.345 cw(c154.553,57.091) 154.732,57.271 U7.76@155.909,56.094
DUT_PA5: JP5.12 U7.75 | length 79
  Top Layer w0.254: JP5.12@117.809,113.27 116.575,112.036 116.575,101.804 ccw(c116.829,101.805) 116.648,101.627 140.739,77.536 cw(c140.56,77.356) 140.763,77.508 cw(c140.56,77.356) 140.814,77.356 140.814,58.186 142.906,56.094 U7.75@153.369,56.094
DUT_PA6: JP5.28 U7.78 | length 81.1
  Top Layer w0.254: JP5.28@115.269,110.73 115.269,101.331 139.859,76.741 ; 139.862,76.737 140.136,76.464 140.136,57.214 142.545,54.805 154.553,54.805 cw(c154.553,54.551) 154.732,54.731 U7.78@155.909,53.554
DUT_PA7: JP5.13 U7.77 | length 83.2
  Top Layer w0.254: JP5.13@115.269,113.27 113.975,111.976 113.975,100.95 139.321,75.604 ; 139.325,75.6 139.459,75.466 139.459,56.166 142.071,53.554 U7.77@153.369,53.554
DUT_PA9: R32.1 U7.33 | length 25.7
  Top Layer w0.254: R32.1@80.217,69.048 81.354,69.048 cw(c81.354,68.794) 81.507,68.997 cw(c81.354,68.794) 81.534,68.974 82.357,68.15 cw(c82.177,67.971) 82.431,67.971 82.431,50.973 ccw(c82.685,50.974) 82.505,50.795 82.506,50.794 84.753,48.547 ccw(c84.931,48.728) 84.93,48.474 U7.33@87.329,48.474
DUT_PA10: R34.1 U7.34 | length 30.2
  Top Layer w0.254: R34.1@80.217,71.588 81.857,71.588 cw(c81.857,71.334) 82.009,71.537 cw(c81.857,71.334) 82.036,71.514 82.836,70.714 cw(c82.657,70.534) 82.911,70.534 82.911,51.947 ccw(c83.165,51.947) 82.985,51.768 85.078,49.674 85.079,49.673 ccw(c85.257,49.854) 85.08,49.672 ccw(c85.258,49.854) 85.258,49.6 87.77,49.6 cw(c87.77,49.346) 87.922,49.549 cw(c87.77,49.346) 87.949,49.526 88.927,48.548 ccw(c89.106,48.728) 89.106,48.474 U7.34@89.869,48.474
DUT_PA11: JP4.15 U7.31 | length 51.6
  Top Layer w0.254: U7.31@87.329,51.014 88.106,51.014 cw(c88.106,50.76) 88.285,50.94 89.391,49.834 ccw(c89.57,50.014) 89.418,49.811 ccw(c89.57,50.014) 89.57,49.76 90.885,49.76 cw(c90.885,49.506) 91.037,49.709 cw(c90.885,49.506) 91.064,49.686 110.115,30.635 cw(c109.935,30.456) 110.138,30.608 cw(c109.935,30.456) 110.189,30.456 JP4.15@110.189,10.27
DUT_PA12: JP4.26 U7.32 | length 54.1
  Top Layer w0.254: U7.32@89.869,51.014 92.006,51.014 cw(c92.006,50.76) 92.158,50.963 cw(c92.006,50.76) 92.185,50.94 111.396,31.729 cw(c111.216,31.55) 111.419,31.702 cw(c111.216,31.55) 111.47,31.55 111.47,9.011 JP4.26@110.189,7.73
DUT_PA15: JP4.14 U7.29 | length 56.8
  Top Layer w0.254: U7.29@87.329,53.554 88.583,52.3 93.545,52.3 cw(c93.545,52.046) 93.697,52.249 cw(c93.545,52.046) 93.724,52.226 112.655,33.295 cw(c112.475,33.116) 112.678,33.268 cw(c112.475,33.116) 112.729,33.116 JP4.14@112.729,10.27
DUT_PB0: JP5.26 U7.82 | length 89.7
  Top Layer w0.254: JP5.26@110.189,110.73 110.189,98.816 ccw(c110.443,98.816) 110.24,98.664 ccw(c110.443,98.816) 110.263,98.637 137.352,71.548 cw(c137.173,71.368) 137.376,71.521 cw(c137.173,71.368) 137.427,71.368 137.427,52.404 140.106,49.725 154.553,49.725 cw(c154.553,49.471) 154.732,49.651 U7.82@155.909,48.474
DUT_PB1: JP5.15 U7.81 | length 91.9
  Top Layer w0.254: JP5.15@110.189,113.27 108.994,112.075 ccw(c109.174,111.896) 108.971,112.048 ccw(c109.174,111.896) 108.92,111.896 108.92,98.395 ccw(c109.174,98.395) 108.971,98.243 ccw(c109.174,98.395) 108.994,98.216 136.675,70.535 cw(c136.495,70.355) 136.698,70.508 cw(c136.495,70.355) 136.749,70.355 136.749,51.08 139.355,48.474 U7.81@153.369,48.474
DUT_PB3: JP4.10 U7.17 | length 80.1
  Top Layer w0.254: U7.17@87.329,68.794 88.474,67.649 ccw(c88.653,67.829) 88.653,67.575 100.169,67.575 101.022,66.722 ; 101.019,66.726 121.959,45.785 122.889,44.855 JP4.10@122.889,10.27
DUT_PB5: JP4.31 U7.18 | length 82.6
  Top Layer w0.254: U7.18@89.869,68.794 101.448,68.794 124.181,46.061 124.181,9.022 JP4.31@122.889,7.73
DUT_PB6: JP4.9 U7.15 | length 85.1
  Top Layer w0.254: U7.15@87.329,71.334 88.564,70.099 ccw(c88.743,70.279) 88.743,70.025 102.726,70.025 103.813,68.938 ; 103.809,68.941 124.506,48.245 125.429,47.322 JP4.9@125.429,10.27
DUT_PB7: JP4.32 U7.16 | length 87.8
  Top Layer w0.254: U7.16@89.869,71.334 104.086,71.334 cw(c104.086,71.08) 104.238,71.283 cw(c104.086,71.08) 104.265,71.26 126.583,48.942 126.71,48.815 126.71,9.011 JP4.32@125.429,7.73
DUT_PB10: JP5.20 U7.91 | length 114.7
  Top Layer w0.254: JP5.20@97.489,113.27 94.225,110.006 94.225,90.83 ccw(c94.479,90.83) 94.276,90.678 ccw(c94.479,90.83) 94.299,90.651 129.901,55.049 cw(c129.721,54.87) 129.924,55.022 cw(c129.721,54.87) 129.975,54.87 129.975,39.78 ccw(c130.229,39.78) 130.049,39.601 133.802,35.848 ccw(c133.981,36.028) 133.829,35.825 ccw(c133.981,36.028) 133.981,35.774 U7.91@153.369,35.774
DUT_PB11: JP4.34 U7.94 | length 46.5
  Top Layer w0.254: JP4.34@130.509,7.73 131.775,8.996 131.775,27 136.75,31.975 154.65,31.975 U7.94@155.909,33.234
DUT_PB12: JP4.7 U7.93 | length 42.6
  Top Layer w0.254: JP4.7@130.509,10.27 130.509,27.709 136.034,33.234 U7.93@153.369,33.234
DUT_PB13: JP4.35 U7.96 | length 41.8
  Top Layer w0.254: JP4.35@133.049,7.73 134.315,8.996 134.315,25.015 138.4,29.1 154.315,29.1 U7.96@155.909,30.694
DUT_PB14: JP4.6 U7.95 | length 37.9
  Top Layer w0.254: JP4.6@133.049,10.27 133.049,25.924 137.819,30.694 U7.95@153.369,30.694
DUT_PC0: JP5.33 U7.66 | length 57.2
  Top Layer w0.254: JP5.33@127.969,110.73 127.969,106.586 ccw(c128.223,106.586) 128.02,106.434 ccw(c128.223,106.586) 128.043,106.407 146.836,87.614 cw(c146.656,87.434) 146.86,87.587 cw(c146.656,87.434) 146.91,87.434 146.91,71.415 148.28,70.045 154.553,70.045 cw(c154.553,69.791) 154.732,69.971 U7.66@155.909,68.794
DUT_PC1: JP5.8 U7.65 | length 59.4
  Top Layer w0.254: JP5.8@127.969,113.27 126.7,112.001 126.7,106.38 ccw(c126.954,106.38) 126.751,106.228 ccw(c126.954,106.38) 126.774,106.201 146.159,86.816 cw(c145.979,86.637) 146.182,86.789 cw(c145.979,86.637) 146.233,86.637 146.233,70.192 147.631,68.794 U7.65@153.369,68.794
DUT_PC2: JP5.32 U7.68 | length 61.2
  Top Layer w0.254: JP5.32@125.429,110.73 125.429,106.101 ccw(c125.683,106.101) 125.48,105.949 ccw(c125.683,106.101) 125.503,105.922 145.481,85.944 cw(c145.302,85.764) 145.505,85.917 cw(c145.302,85.764) 145.556,85.764 145.556,69.494 147.545,67.505 154.553,67.505 cw(c154.553,67.251) 154.732,67.431 U7.68@155.909,66.254
DUT_PC3: JP5.9 U7.67 | length 63.3
  Top Layer w0.254: JP5.9@125.429,113.27 124.175,112.016 124.175,105.555 ccw(c124.429,105.555) 124.226,105.403 ccw(c124.429,105.555) 124.249,105.376 144.804,84.821 cw(c144.624,84.642) 144.827,84.794 cw(c144.624,84.642) 144.878,84.642 144.878,68.397 147.021,66.254 U7.67@153.369,66.254
DUT_PC4: JP5.27 U7.80 | length 85.3
  Top Layer w0.254: JP5.27@112.729,110.73 112.729,100.024 ccw(c112.983,100.026) 112.802,99.848 138.707,73.943 cw(c138.527,73.763) 138.731,73.916 cw(c138.527,73.763) 138.781,73.763 138.781,54.944 141.46,52.265 154.553,52.265 cw(c154.553,52.011) 154.732,52.191 U7.80@155.909,51.014
DUT_PC5: JP5.14 U7.79 | length 87.3
  Top Layer w0.254: JP5.14@112.729,113.27 111.47,112.011 111.47,99.485 ccw(c111.724,99.485) 111.521,99.333 ccw(c111.724,99.485) 111.544,99.306 138.03,72.82 cw(c137.85,72.641) 138.053,72.793 cw(c137.85,72.641) 138.104,72.641 138.104,54.029 141.119,51.014 U7.79@153.369,51.014
DUT_PC6: JP4.24 U7.40 | length 42
  Top Layer w0.254: U7.40@89.869,40.854 92.266,40.854 cw(c92.266,40.6) 92.393,40.82 cw(c92.266,40.6) 92.445,40.78 106.328,26.897 cw(c106.148,26.718) 106.368,26.845 cw(c106.148,26.718) 106.402,26.718 106.402,9.023 JP4.24@105.109,7.73